# Altium PCB fotolitoTop.PcbDoc (part 3 of 4)
Units mil, origin at the board's own origin, x right, y up, seen from the top; angles counter-clockwise.
Board outline 7874.02 x 11220.47 mil, 2 copper layers (Top Layer, Bottom Layer); 110 components, 0 nets, 500 pads, 136 vias.
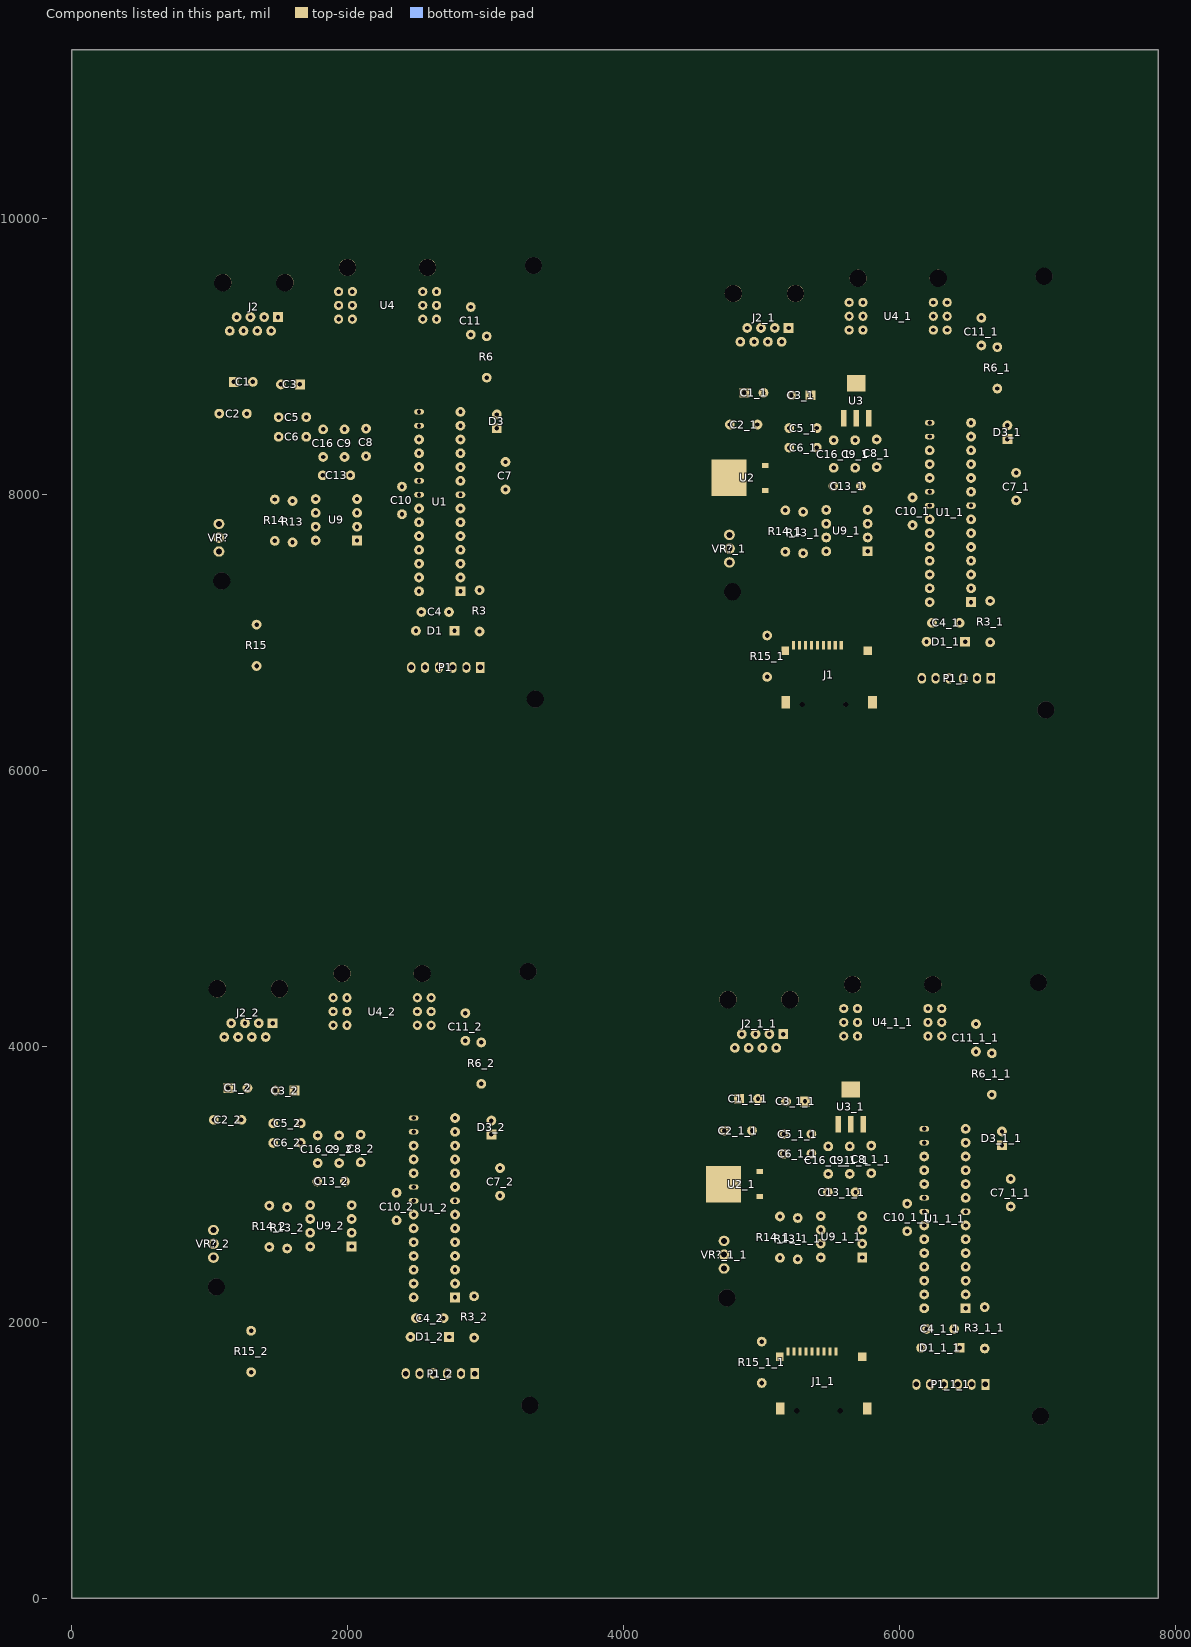
[diagram p3: the components of this part, seen from the top]

## Via types
v1: diameter 70.87, hole 27.56, Top Layer to Bottom Layer, 136 vias

## Nets (pads, with @x,y where several pads share a name; then routed paths per layer and width w, separated by ;. In a path a pad name is that pad's centre, name@x,y a point inside that pad or via, vN(x,y) a via of type N, cw(c..) or ccw(c..) an arc to the next point about the centre after c; other vN are vias at no path point) (continued)
copper on no net: (continued)
  Top Layer w1: 6952.5,2056.09 6952.5,2061.09 ; 6952.5,2063.09 6952.5,2068.09 ; 6952.5,2076.09 6952.5,2081.09 ; 6952.5,2083.09 6952.5,2092.09 ; 6952.5,2093.09 6952.5,2096.09 ; 6952.5,2101.09 6952.5,2105.09 ; 6952.5,2107.09 6952.5,2110.09 ; 6952.5,2112.09 6952.5,2116.09 ; 6952.5,2119.09 6952.5,2124.09 ; 6952.5,2127.09 6952.5,2133.09 ; 6952.5,2136.09 6952.5,2141.09 ; 6952.5,2146.09 6952.5,2164.09 ; 6952.5,2193.09 6952.5,2207.09 ; 6952.5,2208.09 6952.5,2342.09 ; 6952.87,6978.2 6952.87,7032.2 ; 6952.87,7044.2 6952.87,7047.2 ; 6952.87,7059.2 6952.87,7067.2 ; 6952.87,7076.2 6952.87,7082.2 ; 6952.87,7087.2 6952.87,7092.2 ; 6952.87,7121.2 6952.87,7133.2 ; 6952.87,7135.2 6952.87,7164.2 ; 6952.87,7165.2 6952.87,7233.2 ; 6952.87,7325.2 6952.87,7446.2 ; 6953.5,2056.09 6953.5,2061.09 ; 6953.5,2063.09 6953.5,2068.09 ; 6953.5,2076.09 6953.5,2081.09 ; 6953.5,2082.09 6953.5,2091.09 ; 6953.5,2092.09 6953.5,2093.09 ; 6953.5,2094.09 6953.5,2097.09 ; 6953.5,2102.09 6953.5,2105.09 ; 6953.5,2107.09 6953.5,2117.09 ; 6953.5,2119.09 6953.5,2125.09 ; 6953.5,2126.09 6953.5,2134.09 ; 6953.5,2136.09 6953.5,2142.09 ; 6953.5,2145.09 6953.5,2164.09 ; 6953.5,2193.09 6953.5,2342.09 ; 6953.87,6978.2 6953.87,7031.2 ; 6953.87,7044.2 6953.87,7047.2 ; 6953.87,7059.2 6953.87,7066.2 ; 6953.87,7075.2 6953.87,7079.2 ; 6953.87,7080.2 6953.87,7081.2 ; 6953.87,7087.2 6953.87,7091.2 ; 6953.87,7122.2 6953.87,7131.2 ; 6953.87,7136.2 6953.87,7164.2 ; 6953.87,7165.2 6953.87,7237.2 ; 6953.87,7325.2 6953.87,7446.2 ; 6954.5,1955.09 6954.5,1958.09 ; 6954.5,1962.09 6954.5,1963.09 ; 6954.5,2058.09 6954.5,2068.09 ; 6954.5,2076.09 6954.5,2081.09 ; 6954.5,2082.09 6954.5,2090.09 ; 6954.5,2091.09 6954.5,2099.09 ; 6954.5,2101.09 6954.5,2105.09 ; 6954.5,2107.09 6954.5,2117.09 ; 6954.5,2119.09 6954.5,2133.09 ; 6954.5,2135.09 6954.5,2164.09 ; 6954.5,2192.09 6954.5,2343.09 ; 6954.87,6978.2 6954.87,7030.2 ; 6954.87,7044.2 6954.87,7046.2 ; 6954.87,7059.2 6954.87,7064.2 ; 6954.87,7075.2 6954.87,7079.2 ; 6954.87,7087.2 6954.87,7091.2 ; 6954.87,7122.2 6954.87,7129.2 ; 6954.87,7136.2 6954.87,7164.2 ; 6954.87,7165.2 6954.87,7239.2 ; 6954.87,7324.2 6954.87,7447.2 ; 6955.5,1954.09 6955.5,1958.09 ; 6955.5,1962.09 6955.5,1963.09 ; 6955.5,2062.09 6955.5,2068.09 ; 6955.5,2075.09 6955.5,2081.09 ; 6955.5,2082.09 6955.5,2087.09 ; 6955.5,2091.09 6955.5,2106.09 ; 6955.5,2107.09 6955.5,2133.09 ; 6955.5,2134.09 6955.5,2165.09 ; 6955.5,2192.09 6955.5,2343.09 ; 6955.87,6978.2 6955.87,7029.2 ; 6955.87,7044.2 6955.87,7046.2 ; 6955.87,7059.2 6955.87,7062.2 ; 6955.87,7075.2 6955.87,7079.2 ; 6955.87,7086.2 6955.87,7090.2 ; 6955.87,7122.2 6955.87,7129.2 ; 6955.87,7136.2 6955.87,7164.2 ; 6955.87,7165.2 6955.87,7243.2 ; 6955.87,7324.2 6955.87,7447.2 ; 6956.5,1954.09 6956.5,1958.09 ; 6956.5,1962.09 6956.5,1963.09 ; 6956.5,2066.09 6956.5,2068.09 ; 6956.5,2074.09 6956.5,2087.09 ; 6956.5,2090.09 6956.5,2106.09 ; 6956.5,2107.09 6956.5,2165.09 ; 6956.5,2192.09 6956.5,2343.09 ; 6956.87,6978.2 6956.87,7027.2 ; 6956.87,7044.2 6956.87,7046.2 ; 6956.87,7058.2 6956.87,7062.2 ; 6956.87,7075.2 6956.87,7079.2 ; 6956.87,7086.2 6956.87,7090.2 ; 6956.87,7122.2 6956.87,7129.2 ; 6956.87,7137.2 6956.87,7164.2 ; 6956.87,7165.2 6956.87,7245.2 ; 6956.87,7323.2 6956.87,7447.2 ; 6957.5,1954.09 6957.5,1959.09 ; 6957.5,1961.09 6957.5,1963.09 ; 6957.5,2073.09 6957.5,2087.09 ; 6957.5,2088.09 6957.5,2106.09 ; 6957.5,2107.09 6957.5,2165.09 ; 6957.5,2191.09 6957.5,2344.09 ; 6957.87,6978.2 6957.87,7025.2 ; 6957.87,7045.2 6957.87,7046.2 ; 6957.87,7058.2 6957.87,7061.2 ; 6957.87,7074.2 6957.87,7078.2 ; 6957.87,7087.2 6957.87,7090.2 ; 6957.87,7121.2 6957.87,7129.2 ; 6957.87,7131.2 6957.87,7133.2 ; 6957.87,7137.2 6957.87,7163.2 ; 6957.87,7165.2 6957.87,7247.2 ; 6957.87,7323.2 6957.87,7448.2 ; 6958.5,1954.09 6958.5,1959.09 ; 6958.5,1961.09 6958.5,1964.09 ; 6958.5,2073.09 6958.5,2166.09 ; 6958.5,2191.09 6958.5,2344.09 ; 6958.87,6978.2 6958.87,7022.2 ; 6958.87,7058.2 6958.87,7061.2 ; 6958.87,7074.2 6958.87,7078.2 ; 6958.87,7087.2 6958.87,7089.2 ; 6958.87,7121.2 6958.87,7129.2 ; 6958.87,7130.2 6958.87,7134.2 ; 6958.87,7137.2 6958.87,7163.2 ; 6958.87,7165.2 6958.87,7249.2 ; 6958.87,7323.2 6958.87,7448.2 ; 6959.5,1954.09 6959.5,1958.09 ; 6959.5,1961.09 6959.5,1964.09 ; 6959.5,2078.09 6959.5,2166.09 ; 6959.5,2190.09 6959.5,2345.09 ; 6959.87,6978.2 6959.87,7015.2 ; 6959.87,7058.2 6959.87,7060.2 ; 6959.87,7087.2 6959.87,7088.2 ; 6959.87,7122.2 6959.87,7134.2 ; 6959.87,7138.2 6959.87,7164.2 ; 6959.87,7165.2 6959.87,7174.2 ; 6959.87,7175.2 6959.87,7251.2 ; 6959.87,7322.2 6959.87,7448.2 ; 6960.5,1953.09 6960.5,1958.09 ; 6960.5,1960.09 6960.5,1964.09 ; 6960.5,2082.09 6960.5,2166.09 ; 6960.5,2190.09 6960.5,2345.09 ; 6960.87,7058.2 6960.87,7060.2 ; 6960.87,7122.2 6960.87,7134.2 ; 6960.87,7139.2 6960.87,7162.2 ; 6960.87,7166.2 6960.87,7174.2 ; 6960.87,7175.2 6960.87,7192.2 ; 6960.87,7193.2 6960.87,7253.2 ; 6960.87,7322.2 6960.87,7449.2 ; 6961.5,1953.09 6961.5,1958.09 ; 6961.5,1960.09 6961.5,1964.09 ; 6961.5,2086.09 6961.5,2166.09 ; 6961.5,2190.09 6961.5,2345.09 ; 6961.87,7122.2 6961.87,7134.2 ; 6961.87,7140.2 6961.87,7142.2 ; 6961.87,7143.2 6961.87,7146.2 ; 6961.87,7148.2 6961.87,7161.2 ; 6961.87,7166.2 6961.87,7173.2 ; 6961.87,7176.2 6961.87,7191.2 ; 6961.87,7193.2 6961.87,7255.2 ; 6961.87,7322.2 6961.87,7449.2 ; 6962.5,1953.09 6962.5,1958.09 ; 6962.5,1960.09 6962.5,1964.09 ; 6962.5,2089.09 6962.5,2166.09 ; 6962.5,2189.09 6962.5,2345.09 ; 6962.87,7122.2 6962.87,7134.2 ; 6962.87,7144.2 6962.87,7145.2 ; 6962.87,7148.2 6962.87,7161.2 ; 6962.87,7166.2 6962.87,7173.2 ; 6962.87,7177.2 6962.87,7191.2 ; 6962.87,7192.2 6962.87,7257.2 ; 6962.87,7321.2 6962.87,7449.2 ; 6963.5,1953.09 6963.5,1958.09 ; 6963.5,1960.09 6963.5,1964.09 ; 6963.5,2093.09 6963.5,2166.09 ; 6963.5,2189.09 6963.5,2346.09 ; 6963.87,7122.2 6963.87,7129.2 ; 6963.87,7149.2 6963.87,7161.2 ; 6963.87,7166.2 6963.87,7171.2 ; 6963.87,7177.2 6963.87,7259.2 ; 6963.87,7321.2 6963.87,7450.2 ; 6964.5,1954.09 6964.5,1958.09 ; 6964.5,1960.09 6964.5,1964.09 ; 6964.5,2095.09 6964.5,2166.09 ; 6964.5,2189.09 6964.5,2346.09 ; 6964.87,7122.2 6964.87,7128.2 ; 6964.87,7149.2 6964.87,7161.2 ; 6964.87,7166.2 6964.87,7171.2 ; 6964.87,7178.2 6964.87,7260.2 ; 6964.87,7321.2 6964.87,7450.2 ; 6965.5,1954.09 6965.5,1958.09 ; 6965.5,1960.09 6965.5,1964.09 ; 6965.5,2097.09 6965.5,2167.09 ; 6965.5,2188.09 6965.5,2347.09 ; 6965.87,7122.2 6965.87,7127.2 ; 6965.87,7150.2 6965.87,7161.2 ; 6965.87,7166.2 6965.87,7170.2 ; 6965.87,7178.2 6965.87,7190.2 ; 6965.87,7191.2 6965.87,7226.2 ; 6965.87,7228.2 6965.87,7262.2 ; 6965.87,7320.2 6965.87,7451.2 ; 6966.5,1954.09 6966.5,1958.09 ; 6966.5,1960.09 6966.5,1965.09 ; 6966.5,2099.09 6966.5,2167.09 ; 6966.5,2188.09 6966.5,2347.09 ; 6966.87,7122.2 6966.87,7126.2 ; 6966.87,7150.2 6966.87,7161.2 ; 6966.87,7167.2 6966.87,7170.2 ; 6966.87,7178.2 6966.87,7190.2 ; 6966.87,7191.2 6966.87,7226.2 ; 6966.87,7228.2 6966.87,7263.2 ; 6966.87,7320.2 6966.87,7451.2 ; 6967.5,1954.09 6967.5,1958.09 ; 6967.5,1960.09 6967.5,1965.09 ; 6967.5,2100.09 6967.5,2167.09 ; 6967.5,2188.09 6967.5,2347.09 ; 6967.87,7123.2 6967.87,7125.2 ; 6967.87,7149.2 6967.87,7161.2 ; 6967.87,7167.2 6967.87,7170.2 ; 6967.87,7178.2 6967.87,7189.2 ; 6967.87,7191.2 6967.87,7206.2 ; 6967.87,7208.2 6967.87,7226.2 ; 6967.87,7228.2 6967.87,7265.2 ; 6967.87,7320.2 6967.87,7451.2 ; 6968.5,1954.09 6968.5,1958.09 ; 6968.5,1960.09 6968.5,1965.09 ; 6968.5,2101.09 6968.5,2167.09 ; 6968.5,2187.09 6968.5,2348.09 ; 6968.87,7123.2 6968.87,7125.2 ; 6968.87,7149.2 6968.87,7155.2 ; 6968.87,7156.2 6968.87,7162.2 ; 6968.87,7167.2 6968.87,7169.2 ; 6968.87,7178.2 6968.87,7188.2 ; 6968.87,7190.2 6968.87,7205.2 ; 6968.87,7209.2 6968.87,7226.2 ; 6968.87,7228.2 6968.87,7266.2 ; 6968.87,7319.2 6968.87,7452.2 ; 6969.5,1950.09 6969.5,1952.09 ; 6969.5,1954.09 6969.5,1958.09 ; 6969.5,1961.09 6969.5,1965.09 ; 6969.5,2102.09 6969.5,2167.09 ; 6969.5,2187.09 6969.5,2348.09 ; 6969.87,7157.2 6969.87,7162.2 ; 6969.87,7179.2 6969.87,7187.2 ; 6969.87,7191.2 6969.87,7202.2 ; 6969.87,7210.2 6969.87,7226.2 ; 6969.87,7230.2 6969.87,7267.2 ; 6969.87,7319.2 6969.87,7452.2 ; 6970.5,1950.09 6970.5,1952.09 ; 6970.5,1954.09 6970.5,1958.09 ; 6970.5,1961.09 6970.5,1965.09 ; 6970.5,2102.09 6970.5,2167.09 ; 6970.5,2187.09 6970.5,2348.09 ; 6970.87,7157.2 6970.87,7162.2 ; 6970.87,7179.2 6970.87,7184.2 ; 6970.87,7185.2 6970.87,7186.2 ; 6970.87,7192.2 6970.87,7195.2 ; 6970.87,7196.2 6970.87,7202.2 ; 6970.87,7211.2 6970.87,7214.2 ; 6970.87,7216.2 6970.87,7227.2 ; 6970.87,7231.2 6970.87,7259.2 ; 6970.87,7261.2 6970.87,7265.2 ; 6970.87,7266.2 6970.87,7267.2 ; 6970.87,7319.2 6970.87,7452.2 ; 6971.5,1949.09 6971.5,1952.09 ; 6971.5,1954.09 6971.5,1958.09 ; 6971.5,1961.09 6971.5,1965.09 ; 6971.5,1996.09 6971.5,2005.09 ; 6971.5,2016.09 6971.5,2051.09 ; 6971.5,2103.09 6971.5,2167.09 ; 6971.5,2186.09 6971.5,2349.09 ; 6971.87,7157.2 6971.87,7162.2 ; 6971.87,7179.2 6971.87,7184.2 ; 6971.87,7193.2 6971.87,7194.2 ; 6971.87,7197.2 6971.87,7201.2 ; 6971.87,7212.2 6971.87,7213.2 ; 6971.87,7215.2 6971.87,7227.2 ; 6971.87,7232.2 6971.87,7249.2 ; 6971.87,7250.2 6971.87,7257.2 ; 6971.87,7261.2 6971.87,7265.2 ; 6971.87,7318.2 6971.87,7453.2 ; 6972.5,1949.09 6972.5,1953.09 ; 6972.5,1954.09 6972.5,1958.09 ; 6972.5,1961.09 6972.5,1965.09 ; 6972.5,1996.09 6972.5,2005.09 ; 6972.5,2008.09 6972.5,2051.09 ; 6972.5,2104.09 6972.5,2167.09 ; 6972.5,2186.09 6972.5,2349.09 ; 6972.87,7158.2 6972.87,7162.2 ; 6972.87,7179.2 6972.87,7183.2 ; 6972.87,7197.2 6972.87,7201.2 ; 6972.87,7215.2 6972.87,7227.2 ; 6972.87,7232.2 6972.87,7248.2 ; 6972.87,7250.2 6972.87,7257.2 ; 6972.87,7260.2 6972.87,7265.2 ; 6972.87,7318.2 6972.87,7453.2 ; 6973.5,1949.09 6973.5,1953.09 ; 6973.5,1954.09 6973.5,1958.09 ; 6973.5,1961.09 6973.5,1965.09 ; 6973.5,1996.09 6973.5,2051.09 ; 6973.5,2104.09 6973.5,2167.09 ; 6973.5,2186.09 6973.5,2350.09 ; 6973.87,7158.2 6973.87,7161.2 ; 6973.87,7179.2 6973.87,7183.2 ; 6973.87,7197.2 6973.87,7201.2 ; 6973.87,7216.2 6973.87,7227.2 ; 6973.87,7232.2 6973.87,7247.2 ; 6973.87,7250.2 6973.87,7257.2 ; 6973.87,7260.2 6973.87,7265.2 ; 6973.87,7317.2 6973.87,7454.2 ; 6974.5,1948.09 6974.5,1958.09 ; 6974.5,1961.09 6974.5,1966.09 ; 6974.5,1996.09 6974.5,2051.09 ; 6974.5,2104.09 6974.5,2167.09 ; 6974.5,2185.09 6974.5,2350.09 ; 6974.87,7180.2 6974.87,7182.2 ; 6974.87,7197.2 6974.87,7202.2 ; 6974.87,7217.2 6974.87,7220.2 ; 6974.87,7224.2 6974.87,7226.2 ; 6974.87,7233.2 6974.87,7239.2 ; 6974.87,7240.2 6974.87,7243.2 ; 6974.87,7251.2 6974.87,7256.2 ; 6974.87,7262.2 6974.87,7264.2 ; 6974.87,7317.2 6974.87,7319.2 ; 6974.87,7320.2 6974.87,7454.2 ; 6975.5,1948.09 6975.5,1958.09 ; 6975.5,1961.09 6975.5,1966.09 ; 6975.5,1975.09 6975.5,1977.09 ; 6975.5,1996.09 6975.5,1999.09 ; 6975.5,2001.09 6975.5,2052.09 ; 6975.5,2104.09 6975.5,2166.09 ; 6975.5,2185.09 6975.5,2350.09 ; 6975.87,7180.2 6975.87,7182.2 ; 6975.87,7197.2 6975.87,7201.2 ; 6975.87,7235.2 6975.87,7238.2 ; 6975.87,7241.2 6975.87,7243.2 ; 6975.87,7252.2 6975.87,7255.2 ; 6975.87,7317.2 6975.87,7319.2 ; 6975.87,7321.2 6975.87,7454.2 ; 6976.5,1948.09 6976.5,1958.09 ; 6976.5,1961.09 6976.5,1966.09 ; 6976.5,1975.09 6976.5,1977.09 ; 6976.5,1997.09 6976.5,1998.09 ; 6976.5,2001.09 6976.5,2052.09 ; 6976.5,2104.09 6976.5,2166.09 ; 6976.5,2184.09 6976.5,2351.09 ; 6976.87,7197.2 6976.87,7201.2 ; 6976.87,7253.2 6976.87,7254.2 ; 6976.87,7316.2 6976.87,7318.2 ; 6976.87,7322.2 6976.87,7336.2 ; 6976.87,7337.2 6976.87,7388.2 ; 6976.87,7392.2 6976.87,7454.2 ; 6977.5,1948.09 6977.5,1958.09 ; 6977.5,1961.09 6977.5,1966.09 ; 6977.5,1975.09 6977.5,1977.09 ; 6977.5,2001.09 6977.5,2053.09 ; 6977.5,2104.09 6977.5,2166.09 ; 6977.5,2184.09 6977.5,2351.09 ; 6977.87,7197.2 6977.87,7201.2 ; 6977.87,7327.2 6977.87,7331.2 ; 6977.87,7340.2 6977.87,7358.2 ; 6977.87,7360.2 6977.87,7364.2 ; 6977.87,7366.2 6977.87,7376.2 ; 6977.87,7378.2 6977.87,7381.2 ; 6977.87,7383.2 6977.87,7388.2 ; 6977.87,7393.2 6977.87,7412.2 ; 6977.87,7413.2 6977.87,7418.2 ; 6977.87,7419.2 6977.87,7455.2 ; 6978.5,1917.09 6978.5,1920.09 ; 6978.5,1943.09 6978.5,1946.09 ; 6978.5,1948.09 6978.5,1958.09 ; 6978.5,1961.09 6978.5,1966.09 ; 6978.5,1975.09 6978.5,1977.09 ; 6978.5,2001.09 6978.5,2006.09 ; 6978.5,2007.09 6978.5,2053.09 ; 6978.5,2104.09 6978.5,2166.09 ; 6978.5,2184.09 6978.5,2351.09 ; 6978.87,7197.2 6978.87,7201.2 ; 6978.87,7345.2 6978.87,7350.2 ; 6978.87,7352.2 6978.87,7357.2 ; 6978.87,7360.2 6978.87,7363.2 ; 6978.87,7369.2 6978.87,7375.2 ; 6978.87,7383.2 6978.87,7388.2 ; 6978.87,7394.2 6978.87,7412.2 ; 6978.87,7414.2 6978.87,7418.2 ; 6978.87,7421.2 6978.87,7455.2 ; 6979.5,1916.09 6979.5,1920.09 ; 6979.5,1943.09 6979.5,1946.09 ; 6979.5,1948.09 6979.5,1958.09 ; 6979.5,1961.09 6979.5,1966.09 ; 6979.5,1975.09 6979.5,1977.09 ; 6979.5,1990.09 6979.5,1993.09 ; 6979.5,2001.09 6979.5,2006.09 ; 6979.5,2007.09 6979.5,2054.09 ; 6979.5,2104.09 6979.5,2166.09 ; 6979.5,2183.09 6979.5,2351.09 ; 6979.87,7198.2 6979.87,7201.2 ; 6979.87,7345.2 6979.87,7348.2 ; 6979.87,7352.2 6979.87,7356.2 ; 6979.87,7361.2 6979.87,7362.2 ; 6979.87,7384.2 6979.87,7387.2 ; 6979.87,7395.2 6979.87,7397.2 ; 6979.87,7399.2 6979.87,7407.2 ; 6979.87,7409.2 6979.87,7411.2 ; 6979.87,7416.2 6979.87,7417.2 ; 6979.87,7423.2 6979.87,7442.2 ; 6979.87,7452.2 6979.87,7454.2 ; 6980.5,1916.09 6980.5,1920.09 ; 6980.5,1942.09 6980.5,1947.09 ; 6980.5,1948.09 6980.5,1958.09 ; 6980.5,1961.09 6980.5,1965.09 ; 6980.5,1975.09 6980.5,1977.09 ; 6980.5,1990.09 6980.5,1993.09 ; 6980.5,2001.09 6980.5,2006.09 ; 6980.5,2008.09 6980.5,2055.09 ; 6980.5,2104.09 6980.5,2166.09 ; 6980.5,2183.09 6980.5,2352.09 ; 6980.87,7345.2 6980.87,7347.2 ; 6980.87,7400.2 6980.87,7403.2 ; 6981.5,1916.09 6981.5,1921.09 ; 6981.5,1942.09 6981.5,1958.09 ; 6981.5,1961.09 6981.5,1965.09 ; 6981.5,1974.09 6981.5,1977.09 ; 6981.5,1990.09 6981.5,1993.09 ; 6981.5,2001.09 6981.5,2006.09 ; 6981.5,2008.09 6981.5,2055.09 ; 6981.5,2104.09 6981.5,2166.09 ; 6981.5,2183.09 6981.5,2352.09 ; 6982.5,1916.09 6982.5,1921.09 ; 6982.5,1941.09 6982.5,1948.09 ; 6982.5,1949.09 6982.5,1958.09 ; 6982.5,1961.09 6982.5,1966.09 ; 6982.5,1975.09 6982.5,1977.09 ; 6982.5,1990.09 6982.5,1994.09 ; 6982.5,2001.09 6982.5,2006.09 ; 6982.5,2008.09 6982.5,2056.09 ; 6982.5,2103.09 6982.5,2166.09 ; 6982.5,2182.09 6982.5,2353.09 ; 6983.5,1916.09 6983.5,1921.09 ; 6983.5,1941.09 6983.5,1948.09 ; 6983.5,1949.09 6983.5,1958.09 ; 6983.5,1961.09 6983.5,1966.09 ; 6983.5,1975.09 6983.5,1977.09 ; 6983.5,1991.09 6983.5,1994.09 ; 6983.5,2000.09 6983.5,2006.09 ; 6983.5,2007.09 6983.5,2057.09 ; 6983.5,2102.09 6983.5,2165.09 ; 6983.5,2182.09 6983.5,2353.09 ; 6983.87,7332.2 6983.87,7334.2 ; 6983.87,7366.2 6983.87,7369.2 ; 6983.87,7389.2 6983.87,7390.2 ; 6983.87,7399.2 6983.87,7400.2 ; 6983.87,7412.2 6983.87,7414.2 ; 6983.87,7431.2 6983.87,7433.2 ; 6983.87,7447.2 6983.87,7449.2 ; 6984.5,1916.09 6984.5,1921.09 ; 6984.5,1941.09 6984.5,1958.09 ; 6984.5,1961.09 6984.5,1966.09 ; 6984.5,1975.09 6984.5,1977.09 ; 6984.5,1991.09 6984.5,1994.09 ; 6984.5,1999.09 6984.5,2006.09 ; 6984.5,2007.09 6984.5,2058.09 ; 6984.5,2102.09 6984.5,2165.09 ; 6984.5,2182.09 6984.5,2353.09 ; 6984.87,7314.2 6984.87,7315.2 ; 6984.87,7331.2 6984.87,7335.2 ; 6984.87,7352.2 6984.87,7354.2 ; 6984.87,7360.2 6984.87,7363.2 ; 6984.87,7365.2 6984.87,7369.2 ; 6984.87,7383.2 6984.87,7384.2 ; 6984.87,7388.2 6984.87,7391.2 ; 6984.87,7396.2 6984.87,7401.2 ; 6984.87,7405.2 6984.87,7410.2 ; 6984.87,7412.2 6984.87,7415.2 ; 6984.87,7418.2 6984.87,7420.2 ; 6984.87,7423.2 6984.87,7425.2 ; 6984.87,7430.2 6984.87,7438.2 ; 6984.87,7446.2 6984.87,7456.2 ; 6985.5,1917.09 6985.5,1921.09 ; 6985.5,1941.09 6985.5,1958.09 ; 6985.5,1961.09 6985.5,1966.09 ; 6985.5,1975.09 6985.5,1977.09 ; 6985.5,1991.09 6985.5,1994.09 ; 6985.5,1999.09 6985.5,2060.09 ; 6985.5,2101.09 6985.5,2165.09 ; 6985.5,2181.09 6985.5,2354.09 ; 6985.87,7313.2 6985.87,7316.2 ; 6985.87,7330.2 6985.87,7335.2 ; 6985.87,7348.2 6985.87,7354.2 ; 6985.87,7357.2 6985.87,7369.2 ; 6985.87,7370.2 6985.87,7377.2 ; 6985.87,7382.2 6985.87,7384.2 ; 6985.87,7387.2 6985.87,7390.2 ; 6985.87,7393.2 6985.87,7415.2 ; 6985.87,7417.2 6985.87,7439.2 ; 6985.87,7445.2 6985.87,7458.2 ; 6986.5,1918.09 6986.5,1921.09 ; 6986.5,1941.09 6986.5,1958.09 ; 6986.5,1961.09 6986.5,1966.09 ; 6986.5,1975.09 6986.5,1977.09 ; 6986.5,1992.09 6986.5,1994.09 ; 6986.5,1999.09 6986.5,2061.09 ; 6986.5,2099.09 6986.5,2165.09 ; 6986.5,2181.09 6986.5,2354.09 ; 6986.87,7211.2 6986.87,7213.2 ; 6986.87,7275.2 6986.87,7280.2 ; 6986.87,7313.2 6986.87,7316.2 ; 6986.87,7319.2 6986.87,7321.2 ; 6986.87,7329.2 6986.87,7338.2 ; 6986.87,7345.2 6986.87,7368.2 ; 6986.87,7370.2 6986.87,7390.2 ; 6986.87,7392.2 6986.87,7440.2 ; 6986.87,7445.2 6986.87,7458.2 ; 6987.5,1918.09 6987.5,1921.09 ; 6987.5,1941.09 6987.5,1958.09 ; 6987.5,1961.09 6987.5,1966.09 ; 6987.5,1975.09 6987.5,1977.09 ; 6987.5,1992.09 6987.5,1994.09 ; 6987.5,1999.09 6987.5,2063.09 ; 6987.5,2098.09 6987.5,2164.09 ; 6987.5,2180.09 6987.5,2354.09 ; 6987.87,7210.2 6987.87,7214.2 ; 6987.87,7230.2 6987.87,7232.2 ; 6987.87,7274.2 6987.87,7280.2 ; 6987.87,7313.2 6987.87,7315.2 ; 6987.87,7318.2 6987.87,7322.2 ; 6987.87,7328.2 6987.87,7338.2 ; 6987.87,7341.2 6987.87,7368.2 ; 6987.87,7370.2 6987.87,7390.2 ; 6987.87,7391.2 6987.87,7458.2 ; 6988.5,1918.09 6988.5,1922.09 ; 6988.5,1942.09 6988.5,1958.09 ; 6988.5,1961.09 6988.5,1966.09 ; 6988.5,1975.09 6988.5,1977.09 ; 6988.5,1992.09 6988.5,1994.09 ; 6988.5,1999.09 6988.5,2066.09 ; 6988.5,2095.09 6988.5,2164.09 ; 6988.5,2180.09 6988.5,2355.09 ; 6988.87,7208.2 6988.87,7214.2 ; 6988.87,7229.2 6988.87,7233.2 ; 6988.87,7272.2 6988.87,7281.2 ; 6988.87,7312.2 6988.87,7323.2 ; 6988.87,7326.2 6988.87,7390.2 ; 6988.87,7391.2 6988.87,7459.2 ; 6989.5,1918.09 6989.5,1922.09 ; 6989.5,1926.09 6989.5,1927.09 ; 6989.5,1942.09 6989.5,1958.09 ; 6989.5,1961.09 6989.5,1967.09 ; 6989.5,1975.09 6989.5,1977.09 ; 6989.5,1993.09 6989.5,1994.09 ; 6989.5,1999.09 6989.5,2070.09 ; 6989.5,2092.09 6989.5,2164.09 ; 6989.5,2180.09 6989.5,2355.09 ; 6989.87,7176.2 6989.87,7178.2 ; 6989.87,7183.2 6989.87,7185.2 ; 6989.87,7196.2 6989.87,7198.2 ; 6989.87,7202.2 6989.87,7204.2 ; 6989.87,7207.2 6989.87,7214.2 ; 6989.87,7220.2 6989.87,7222.2 ; 6989.87,7226.2 6989.87,7228.2 ; 6989.87,7229.2 6989.87,7233.2 ; 6989.87,7237.2 6989.87,7240.2 ; 6989.87,7271.2 6989.87,7281.2 ; 6989.87,7312.2 6989.87,7323.2 ; 6989.87,7325.2 6989.87,7459.2 ; 6990.5,1918.09 6990.5,1922.09 ; 6990.5,1926.09 6990.5,1928.09 ; 6990.5,1942.09 6990.5,1958.09 ; 6990.5,1961.09 6990.5,1967.09 ; 6990.5,1975.09 6990.5,1977.09 ; 6990.5,1993.09 6990.5,1995.09 ; 6990.5,1999.09 6990.5,2164.09 ; 6990.5,2180.09 6990.5,2355.09 ; 6990.87,7175.2 6990.87,7178.2 ; 6990.87,7182.2 6990.87,7186.2 ; 6990.87,7195.2 6990.87,7199.2 ; 6990.87,7201.2 6990.87,7205.2 ; 6990.87,7206.2 6990.87,7215.2 ; 6990.87,7219.2 6990.87,7223.2 ; 6990.87,7225.2 6990.87,7228.2 ; 6990.87,7229.2 6990.87,7234.2 ; 6990.87,7237.2 6990.87,7241.2 ; 6990.87,7255.2 6990.87,7258.2 ; 6990.87,7266.2 6990.87,7268.2 ; 6990.87,7270.2 6990.87,7281.2 ; 6990.87,7311.2 6990.87,7324.2 ; 6990.87,7326.2 6990.87,7460.2 ; 6991.5,1918.09 6991.5,1922.09 ; 6991.5,1925.09 6991.5,1928.09 ; 6991.5,1941.09 6991.5,1958.09 ; 6991.5,1961.09 6991.5,1967.09 ; 6991.5,1974.09 6991.5,1977.09 ; 6991.5,1993.09 6991.5,1995.09 ; 6991.5,1999.09 6991.5,2163.09 ; 6991.5,2179.09 6991.5,2356.09 ; 6991.87,7174.2 6991.87,7179.2 ; 6991.87,7181.2 6991.87,7186.2 ; 6991.87,7194.2 6991.87,7199.2 ; 6991.87,7201.2 6991.87,7210.2 ; 6991.87,7211.2 6991.87,7214.2 ; 6991.87,7219.2 6991.87,7223.2 ; 6991.87,7225.2 6991.87,7228.2 ; 6991.87,7230.2 6991.87,7234.2 ; 6991.87,7237.2 6991.87,7242.2 ; 6991.87,7245.2 6991.87,7251.2 ; 6991.87,7254.2 6991.87,7259.2 ; 6991.87,7264.2 6991.87,7282.2 ; 6991.87,7311.2 6991.87,7325.2 ; 6991.87,7326.2 6991.87,7460.2 ; 6992.5,1808.09 6992.5,1809.09 ; 6992.5,1918.09 6992.5,1922.09 ; 6992.5,1925.09 6992.5,1928.09 ; 6992.5,1941.09 6992.5,1958.09 ; 6992.5,1960.09 6992.5,1967.09 ; 6992.5,1974.09 6992.5,1978.09 ; 6992.5,1993.09 6992.5,1995.09 ; 6992.5,2000.09 6992.5,2163.09 ; 6992.5,2179.09 6992.5,2356.09 ; 6992.87,7174.2 6992.87,7179.2 ; 6992.87,7181.2 6992.87,7186.2 ; 6992.87,7194.2 6992.87,7199.2 ; 6992.87,7200.2 6992.87,7209.2 ; 6992.87,7210.2 6992.87,7211.2 ; 6992.87,7212.2 6992.87,7215.2 ; 6992.87,7220.2 6992.87,7223.2 ; 6992.87,7225.2 6992.87,7235.2 ; 6992.87,7237.2 6992.87,7243.2 ; 6992.87,7244.2 6992.87,7252.2 ; 6992.87,7254.2 6992.87,7260.2 ; 6992.87,7263.2 6992.87,7282.2 ; 6992.87,7311.2 6992.87,7460.2 ; 6993.5,1806.09 6993.5,1811.09 ; 6993.5,1918.09 6993.5,1922.09 ; 6993.5,1925.09 6993.5,1928.09 ; 6993.5,1942.09 6993.5,1958.09 ; 6993.5,1960.09 6993.5,1967.09 ; 6993.5,1973.09 6993.5,1978.09 ; 6993.5,1994.09 6993.5,1995.09 ; 6993.5,2000.09 6993.5,2162.09 ; 6993.5,2178.09 6993.5,2357.09 ; 6993.87,7073.2 6993.87,7076.2 ; 6993.87,7080.2 6993.87,7081.2 ; 6993.87,7176.2 6993.87,7186.2 ; 6993.87,7194.2 6993.87,7199.2 ; 6993.87,7200.2 6993.87,7208.2 ; 6993.87,7209.2 6993.87,7217.2 ; 6993.87,7219.2 6993.87,7223.2 ; 6993.87,7225.2 6993.87,7235.2 ; 6993.87,7237.2 6993.87,7251.2 ; 6993.87,7253.2 6993.87,7282.2 ; 6993.87,7310.2 6993.87,7461.2 ; 6994.5,1805.09 6994.5,1812.09 ; 6994.5,1918.09 6994.5,1922.09 ; 6994.5,1925.09 6994.5,1928.09 ; 6994.5,1942.09 6994.5,1958.09 ; 6994.5,1960.09 6994.5,1966.09 ; 6994.5,1973.09 6994.5,1978.09 ; 6994.5,1994.09 6994.5,1995.09 ; 6994.5,2000.09 6994.5,2162.09 ; 6994.5,2178.09 6994.5,2357.09 ; 6994.87,7072.2 6994.87,7076.2 ; 6994.87,7080.2 6994.87,7081.2 ; 6994.87,7180.2 6994.87,7186.2 ; 6994.87,7193.2 6994.87,7199.2 ; 6994.87,7200.2 6994.87,7205.2 ; 6994.87,7209.2 6994.87,7224.2 ; 6994.87,7225.2 6994.87,7251.2 ; 6994.87,7252.2 6994.87,7283.2 ; 6994.87,7310.2 6994.87,7461.2 ; 6995.5,1804.09 6995.5,1812.09 ; 6995.5,1840.09 6995.5,1842.09 ; 6995.5,1918.09 6995.5,1922.09 ; 6995.5,1924.09 6995.5,1930.09 ; 6995.5,1942.09 6995.5,1958.09 ; 6995.5,1960.09 6995.5,1966.09 ; 6995.5,1972.09 6995.5,1978.09 ; 6995.5,2001.09 6995.5,2161.09 ; 6995.87,7072.2 6995.87,7076.2 ; 6995.87,7080.2 6995.87,7081.2 ; 6995.87,7184.2 6995.87,7186.2 ; 6995.87,7192.2 6995.87,7205.2 ; 6995.87,7208.2 6995.87,7224.2 ; 6995.87,7225.2 6995.87,7283.2 ; 6995.87,7310.2 6995.87,7461.2 ; 6996.5,1804.09 6996.5,1811.09 ; 6996.5,1840.09 6996.5,1842.09 ; 6996.5,1918.09 6996.5,1921.09 ; 6996.5,1924.09 6996.5,1931.09 ; 6996.5,1943.09 6996.5,1958.09 ; 6996.5,1960.09 6996.5,1966.09 ; 6996.5,1970.09 6996.5,1978.09 ; 6996.5,2001.09 6996.5,2161.09 ; 6996.5,2177.09 6996.5,2358.09 ; 6996.87,7072.2 6996.87,7077.2 ; 6996.87,7079.2 6996.87,7081.2 ; 6996.87,7191.2 6996.87,7205.2 ; 6996.87,7206.2 6996.87,7224.2 ; 6996.87,7225.2 6996.87,7283.2 ; 6996.87,7309.2 6996.87,7462.2 ; 6997.5,1806.09 6997.5,1811.09 ; 6997.5,1839.09 6997.5,1842.09 ; 6997.5,1918.09 6997.5,1921.09 ; 6997.5,1924.09 6997.5,1932.09 ; 6997.5,1943.09 6997.5,1958.09 ; 6997.5,1960.09 6997.5,1966.09 ; 6997.5,1968.09 6997.5,1978.09 ; 6997.5,2001.09 6997.5,2161.09 ; 6997.5,2177.09 6997.5,2358.09 ; 6997.87,7072.2 6997.87,7077.2 ; 6997.87,7079.2 6997.87,7082.2 ; 6997.87,7191.2 6997.87,7284.2 ; 6997.87,7309.2 6997.87,7462.2 ; 6998.5,1807.09 6998.5,1811.09 ; 6998.5,1839.09 6998.5,1842.09 ; 6998.5,1846.09 6998.5,1850.09 ; 6998.5,1918.09 6998.5,1921.09 ; 6998.5,1923.09 6998.5,1933.09 ; 6998.5,1943.09 6998.5,1958.09 ; 6998.5,1960.09 6998.5,1965.09 ; 6998.5,1968.09 6998.5,1978.09 ; 6998.5,2001.09 6998.5,2160.09 ; 6998.5,2177.09 6998.5,2358.09 ; 6998.87,7072.2 6998.87,7076.2 ; 6998.87,7079.2 6998.87,7082.2 ; 6998.87,7196.2 6998.87,7284.2 ; 6998.87,7308.2 6998.87,7463.2 ; 6999.5,1807.09 6999.5,1812.09 ; 6999.5,1838.09 6999.5,1842.09 ; 6999.5,1846.09 6999.5,1851.09 ; 6999.5,1918.09 6999.5,1921.09 ; 6999.5,1923.09 6999.5,1932.09 ; 6999.5,1943.09 6999.5,1958.09 ; 6999.5,1960.09 6999.5,1965.09 ; 6999.5,1967.09 6999.5,1978.09 ; 6999.5,2001.09 6999.5,2160.09 ; 6999.5,2176.09 6999.5,2359.09 ; 6999.87,7071.2 6999.87,7076.2 ; 6999.87,7078.2 6999.87,7082.2 ; 6999.87,7200.2 6999.87,7284.2 ; 6999.87,7308.2 6999.87,7463.2 ; 7000.5,1807.09 7000.5,1812.09 ; 7000.5,1838.09 7000.5,1842.09 ; 7000.5,1845.09 7000.5,1851.09 ; 7000.5,1918.09 7000.5,1921.09 ; 7000.5,1923.09 7000.5,1930.09 ; 7000.5,1943.09 7000.5,1958.09 ; 7000.5,1960.09 7000.5,1965.09 ; 7000.5,1967.09 7000.5,1978.09 ; 7000.5,2001.09 7000.5,2159.09 ; 7000.5,2176.09 7000.5,2359.09 ; 7000.87,7071.2 7000.87,7076.2 ; 7000.87,7078.2 7000.87,7082.2 ; 7000.87,7204.2 7000.87,7284.2 ; 7000.87,7308.2 7000.87,7463.2 ; 7001.5,1807.09 7001.5,1812.09 ; 7001.5,1838.09 7001.5,1842.09 ; 7001.5,1845.09 7001.5,1851.09 ; 7001.5,1918.09 7001.5,1921.09 ; 7001.5,1922.09 7001.5,1928.09 ; 7001.5,1943.09 7001.5,1958.09 ; 7001.5,1960.09 7001.5,1965.09 ; 7001.5,1967.09 7001.5,1978.09 ; 7001.5,1998.09 7001.5,1999.09 ; 7001.5,2001.09 7001.5,2159.09 ; 7001.5,2175.09 7001.5,2360.09 ; 7001.87,7071.2 7001.87,7076.2 ; 7001.87,7078.2 7001.87,7082.2 ; 7001.87,7207.2 7001.87,7284.2 ; 7001.87,7307.2 7001.87,7463.2 ; 7002.5,1805.09 7002.5,1811.09 ; 7002.5,1833.09 7002.5,1837.09 ; 7002.5,1838.09 7002.5,1842.09 ; 7002.5,1845.09 7002.5,1851.09 ; 7002.5,1852.09 7002.5,1855.09 ; 7002.5,1918.09 7002.5,1921.09 ; 7002.5,1922.09 7002.5,1928.09 ; 7002.5,1943.09 7002.5,1959.09 ; 7002.5,1960.09 7002.5,1965.09 ; 7002.5,1967.09 7002.5,1978.09 ; 7002.5,1999.09 7002.5,2158.09 ; 7002.5,2175.09 7002.5,2360.09 ; 7002.87,7071.2 7002.87,7076.2 ; 7002.87,7078.2 7002.87,7082.2 ; 7002.87,7211.2 7002.87,7284.2 ; 7002.87,7307.2 7002.87,7464.2 ; 7003.5,1805.09 7003.5,1811.09 ; 7003.5,1829.09 7003.5,1831.09 ; 7003.5,1832.09 7003.5,1837.09 ; 7003.5,1838.09 7003.5,1842.09 ; 7003.5,1845.09 7003.5,1851.09 ; 7003.5,1852.09 7003.5,1855.09 ; 7003.5,1918.09 7003.5,1921.09 ; 7003.5,1922.09 7003.5,1928.09 ; 7003.5,1942.09 7003.5,1959.09 ; 7003.5,1960.09 7003.5,1965.09 ; 7003.5,1968.09 7003.5,1978.09 ; 7003.5,2000.09 7003.5,2157.09 ; 7003.5,2175.09 7003.5,2360.09 ; 7003.87,7072.2 7003.87,7076.2 ; 7003.87,7078.2 7003.87,7082.2 ; 7003.87,7213.2 7003.87,7284.2 ; 7003.87,7307.2 7003.87,7464.2 ; 7004.5,1807.09 7004.5,1812.09 ; 7004.5,1828.09 7004.5,1842.09 ; 7004.5,1845.09 7004.5,1850.09 ; 7004.5,1851.09 7004.5,1856.09 ; 7004.5,1918.09 7004.5,1928.09 ; 7004.5,1942.09 7004.5,1966.09 ; 7004.5,1968.09 7004.5,1978.09 ; 7004.5,2001.09 7004.5,2157.09 ; 7004.5,2175.09 7004.5,2360.09 ; 7004.87,7072.2 7004.87,7076.2 ; 7004.87,7078.2 7004.87,7082.2 ; 7004.87,7215.2 7004.87,7285.2 ; 7004.87,7306.2 7004.87,7465.2 ; 7005.5,1807.09 7005.5,1812.09 ; 7005.5,1828.09 7005.5,1842.09 ; 7005.5,1845.09 7005.5,1850.09 ; 7005.5,1851.09 7005.5,1857.09 ; 7005.5,1918.09 7005.5,1929.09 ; 7005.5,1942.09 7005.5,1966.09 ; 7005.5,1968.09 7005.5,1978.09 ; 7005.5,2001.09 7005.5,2156.09 ; 7005.5,2174.09 7005.5,2361.09 ; 7005.87,7072.2 7005.87,7076.2 ; 7005.87,7078.2 7005.87,7083.2 ; 7005.87,7217.2 7005.87,7285.2 ; 7005.87,7306.2 7005.87,7465.2 ; 7006.5,1807.09 7006.5,1811.09 ; 7006.5,1812.09 7006.5,1814.09 ; 7006.5,1828.09 7006.5,1835.09 ; 7006.5,1836.09 7006.5,1837.09 ; 7006.5,1838.09 7006.5,1842.09 ; 7006.5,1845.09 7006.5,1857.09 ; 7006.5,1918.09 7006.5,1930.09 ; 7006.5,1942.09 7006.5,1958.09 ; 7006.5,1960.09 7006.5,1978.09 ; 7006.5,2002.09 7006.5,2155.09 ; 7006.5,2174.09 7006.5,2235.09 ; 7006.5,2299.09 7006.5,2361.09 ; 7006.87,7072.2 7006.87,7076.2 ; 7006.87,7078.2 7006.87,7083.2 ; 7006.87,7218.2 7006.87,7285.2 ; 7006.87,7306.2 7006.87,7465.2 ; 7007.5,1807.09 7007.5,1816.09 ; 7007.5,1824.09 7007.5,1825.09 ; 7007.5,1828.09 7007.5,1834.09 ; 7007.5,1838.09 7007.5,1842.09 ; 7007.5,1845.09 7007.5,1857.09 ; 7007.5,1916.09 7007.5,1931.09 ; 7007.5,1941.09 7007.5,1958.09 ; 7007.5,1960.09 7007.5,1978.09 ; 7007.5,2002.09 7007.5,2155.09 ; 7007.5,2173.09 7007.5,2234.09 ; 7007.5,2299.09 7007.5,2362.09 ; 7007.87,7072.2 7007.87,7076.2 ; 7007.87,7078.2 7007.87,7083.2 ; 7007.87,7219.2 7007.87,7285.2 ; 7007.87,7305.2 7007.87,7466.2 ; 7008.5,1806.09 7008.5,1817.09 ; 7008.5,1823.09 7008.5,1827.09 ; 7008.5,1828.09 7008.5,1835.09 ; 7008.5,1838.09 7008.5,1842.09 ; 7008.5,1845.09 7008.5,1857.09 ; 7008.5,1916.09 7008.5,1933.09 ; 7008.5,1941.09 7008.5,1958.09 ; 7008.5,1960.09 7008.5,1978.09 ; 7008.5,2003.09 7008.5,2154.09 ; 7008.5,2173.09 7008.5,2234.09 ; 7008.5,2299.09 7008.5,2362.09 ; 7008.87,7068.2 7008.87,7070.2 ; 7008.87,7072.2 7008.87,7076.2 ; 7008.87,7079.2 7008.87,7083.2 ; 7008.87,7220.2 7008.87,7285.2 ; 7008.87,7305.2 7008.87,7466.2 ; 7009.5,1804.09 7009.5,1817.09 ; 7009.5,1822.09 7009.5,1836.09 ; 7009.5,1837.09 7009.5,1842.09 ; 7009.5,1845.09 7009.5,1857.09 ; 7009.5,1916.09 7009.5,1932.09 ; 7009.5,1941.09 7009.5,1978.09 ; 7009.5,2004.09 7009.5,2153.09 ; 7009.5,2173.09 7009.5,2234.09 ; 7009.5,2300.09 7009.5,2362.09 ; 7009.87,7068.2 7009.87,7070.2 ; 7009.87,7072.2 7009.87,7076.2 ; 7009.87,7079.2 7009.87,7083.2 ; 7009.87,7220.2 7009.87,7285.2 ; 7009.87,7305.2 7009.87,7466.2 ; 7010.5,1802.09 7010.5,1818.09 ; 7010.5,1820.09 7010.5,1842.09 ; 7010.5,1845.09 7010.5,1857.09 ; 7010.5,1916.09 7010.5,1937.09 ; 7010.5,1940.09 7010.5,1958.09 ; 7010.5,1960.09 7010.5,1978.09 ; 7010.5,2005.09 7010.5,2152.09 ; 7010.5,2172.09 7010.5,2234.09 ; 7010.5,2300.09 7010.5,2363.09 ; 7010.87,7067.2 7010.87,7070.2 ; 7010.87,7072.2 7010.87,7076.2 ; 7010.87,7079.2 7010.87,7083.2 ; 7010.87,7114.2 7010.87,7123.2 ; 7010.87,7134.2 7010.87,7169.2 ; 7010.87,7221.2 7010.87,7285.2 ; 7010.87,7304.2 7010.87,7467.2 ; 7011.5,1801.09 7011.5,1818.09 ; 7011.5,1819.09 7011.5,1842.09 ; 7011.5,1844.09 7011.5,1856.09 ; 7011.5,1916.09 7011.5,1939.09 ; 7011.5,1940.09 7011.5,1958.09 ; 7011.5,1960.09 7011.5,1978.09 ; 7011.5,2006.09 7011.5,2151.09 ; 7011.5,2172.09 7011.5,2233.09 ; 7011.5,2300.09 7011.5,2363.09 ; 7011.87,7067.2 7011.87,7071.2 ; 7011.87,7072.2 7011.87,7076.2 ; 7011.87,7079.2 7011.87,7083.2 ; 7011.87,7114.2 7011.87,7123.2 ; 7011.87,7126.2 7011.87,7169.2 ; 7011.87,7222.2 7011.87,7285.2 ; 7011.87,7304.2 7011.87,7467.2 ; 7012.5,1800.09 7012.5,1817.09 ; 7012.5,1819.09 7012.5,1842.09 ; 7012.5,1844.09 7012.5,1857.09 ; 7012.5,1916.09 7012.5,1978.09 ; 7012.5,2007.09 7012.5,2151.09 ; 7012.5,2172.09 7012.5,2233.09 ; 7012.5,2301.09 7012.5,2363.09 ; 7012.87,7067.2 7012.87,7071.2 ; 7012.87,7072.2 7012.87,7076.2 ; 7012.87,7079.2 7012.87,7083.2 ; 7012.87,7114.2 7012.87,7169.2 ; 7012.87,7222.2 7012.87,7285.2 ; 7012.87,7304.2 7012.87,7468.2 ; 7013.5,1798.09 7013.5,1817.09 ; 7013.5,1819.09 7013.5,1842.09 ; 7013.5,1843.09 7013.5,1857.09 ; 7013.5,1916.09 7013.5,1978.09 ; 7013.5,2008.09 7013.5,2150.09 ; 7013.5,2171.09 7013.5,2233.09 ; 7013.5,2301.09 7013.5,2364.09 ; 7013.87,7066.2 7013.87,7076.2 ; 7013.87,7079.2 7013.87,7084.2 ; 7013.87,7114.2 7013.87,7169.2 ; 7013.87,7222.2 7013.87,7285.2 ; 7013.87,7303.2 7013.87,7468.2 ; 7014.5,1798.09 7014.5,1818.09 ; 7014.5,1819.09 7014.5,1857.09 ; 7014.5,1917.09 7014.5,1978.09 ; 7014.5,2009.09 7014.5,2148.09 ; 7014.5,2171.09 7014.5,2233.09 ; 7014.5,2301.09 7014.5,2364.09 ; 7014.87,7066.2 7014.87,7076.2 ; 7014.87,7079.2 7014.87,7084.2 ; 7014.87,7093.2 7014.87,7095.2 ; 7014.87,7114.2 7014.87,7117.2 ; 7014.87,7119.2 7014.87,7170.2 ; 7014.87,7222.2 7014.87,7284.2 ; 7014.87,7303.2 7014.87,7468.2 ; 7015.5,1798.09 7015.5,1860.09 ; 7015.5,1917.09 7015.5,1978.09 ; 7015.5,2010.09 7015.5,2148.09 ; 7015.5,2171.09 7015.5,2232.09 ; 7015.5,2301.09 7015.5,2365.09 ; 7015.87,7066.2 7015.87,7076.2 ; 7015.87,7079.2 7015.87,7084.2 ; 7015.87,7093.2 7015.87,7095.2 ; 7015.87,7115.2 7015.87,7116.2 ; 7015.87,7119.2 7015.87,7170.2 ; 7015.87,7222.2 7015.87,7284.2 ; 7015.87,7302.2 7015.87,7469.2 ; 7016.5,1798.09 7016.5,1805.09 ; 7016.5,1806.09 7016.5,1860.09 ; 7016.5,1917.09 7016.5,1978.09 ; 7016.5,2011.09 7016.5,2147.09 ; 7016.5,2170.09 7016.5,2232.09 ; 7016.5,2302.09 7016.5,2365.09 ; 7016.87,7066.2 7016.87,7076.2 ; 7016.87,7079.2 7016.87,7084.2 ; 7016.87,7093.2 7016.87,7095.2 ; 7016.87,7119.2 7016.87,7171.2 ; 7016.87,7222.2 7016.87,7284.2 ; 7016.87,7302.2 7016.87,7469.2 ; 7017.5,1798.09 7017.5,1805.09 ; 7017.5,1807.09 7017.5,1860.09 ; 7017.5,1917.09 7017.5,1978.09 ; 7017.5,2012.09 7017.5,2146.09 ; 7017.5,2170.09 7017.5,2232.09 ; 7017.5,2302.09 7017.5,2365.09 ; 7017.87,7035.2 7017.87,7038.2 ; 7017.87,7061.2 7017.87,7064.2 ; 7017.87,7066.2 7017.87,7076.2 ; 7017.87,7079.2 7017.87,7084.2 ; 7017.87,7093.2 7017.87,7095.2 ; 7017.87,7119.2 7017.87,7124.2 ; 7017.87,7125.2 7017.87,7171.2 ; 7017.87,7222.2 7017.87,7284.2 ; 7017.87,7302.2 7017.87,7469.2 ; 7018.5,1798.09 7018.5,1805.09 ; 7018.5,1807.09 7018.5,1860.09 ; 7018.5,1917.09 7018.5,1978.09 ; 7018.5,2014.09 7018.5,2144.09 ; 7018.5,2169.09 7018.5,2231.09 ; 7018.5,2302.09 7018.5,2366.09 ; 7018.87,7034.2 7018.87,7038.2 ; 7018.87,7061.2 7018.87,7064.2 ; 7018.87,7066.2 7018.87,7076.2 ; 7018.87,7079.2 7018.87,7084.2 ; 7018.87,7093.2 7018.87,7095.2 ; 7018.87,7108.2 7018.87,7111.2 ; 7018.87,7119.2 7018.87,7124.2 ; 7018.87,7125.2 7018.87,7172.2 ; 7018.87,7222.2 7018.87,7284.2 ; 7018.87,7301.2 7018.87,7469.2 ; 7019.5,1798.09 7019.5,1805.09 ; 7019.5,1807.09 7019.5,1860.09 ; 7019.5,1917.09 7019.5,1978.09 ; 7019.5,2015.09 7019.5,2143.09 ; 7019.5,2169.09 7019.5,2231.09 ; 7019.5,2303.09 7019.5,2366.09 ; 7019.87,7034.2 7019.87,7038.2 ; 7019.87,7060.2 7019.87,7065.2 ; 7019.87,7066.2 7019.87,7076.2 ; 7019.87,7079.2 7019.87,7083.2 ; 7019.87,7093.2 7019.87,7095.2 ; 7019.87,7108.2 7019.87,7111.2 ; 7019.87,7119.2 7019.87,7124.2 ; 7019.87,7126.2 7019.87,7173.2 ; 7019.87,7222.2 7019.87,7284.2 ; 7019.87,7301.2 7019.87,7470.2 ; 7020.5,1798.09 7020.5,1806.09 ; 7020.5,1807.09 7020.5,1860.09 ; 7020.5,1917.09 7020.5,1979.09 ; 7020.5,2017.09 7020.5,2142.09 ; 7020.5,2169.09 7020.5,2231.09 ; 7020.5,2303.09 7020.5,2366.09 ; 7020.87,7034.2 7020.87,7039.2 ; 7020.87,7060.2 7020.87,7076.2 ; 7020.87,7079.2 7020.87,7083.2 ; 7020.87,7092.2 7020.87,7095.2 ; 7020.87,7108.2 7020.87,7111.2 ; 7020.87,7119.2 7020.87,7124.2 ; 7020.87,7126.2 7020.87,7173.2 ; 7020.87,7222.2 7020.87,7284.2 ; 7020.87,7301.2 7020.87,7470.2 ; 7021.5,1798.09 7021.5,1860.09 ; 7021.5,1917.09 7021.5,1979.09 ; 7021.5,2018.09 7021.5,2140.09 ; 7021.5,2168.09 7021.5,2231.09 ; 7021.5,2303.09 7021.5,2367.09 ; 7021.87,7034.2 7021.87,7039.2 ; 7021.87,7059.2 7021.87,7066.2 ; 7021.87,7067.2 7021.87,7076.2 ; 7021.87,7079.2 7021.87,7084.2 ; 7021.87,7093.2 7021.87,7095.2 ; 7021.87,7108.2 7021.87,7112.2 ; 7021.87,7119.2 7021.87,7124.2 ; 7021.87,7126.2 7021.87,7174.2 ; 7021.87,7221.2 7021.87,7284.2 ; 7021.87,7300.2 7021.87,7471.2 ; 7022.5,1798.09 7022.5,1860.09 ; 7022.5,1917.09 7022.5,1979.09 ; 7022.5,2020.09 7022.5,2139.09 ; 7022.5,2168.09 7022.5,2230.09 ; 7022.5,2303.09 7022.5,2367.09 ; 7022.87,7034.2 7022.87,7039.2 ; 7022.87,7059.2 7022.87,7066.2 ; 7022.87,7067.2 7022.87,7076.2 ; 7022.87,7079.2 7022.87,7084.2 ; 7022.87,7093.2 7022.87,7095.2 ; 7022.87,7109.2 7022.87,7112.2 ; 7022.87,7118.2 7022.87,7124.2 ; 7022.87,7125.2 7022.87,7175.2 ; 7022.87,7220.2 7022.87,7283.2 ; 7022.87,7300.2 7022.87,7471.2 ; 7023.5,1798.09 7023.5,1860.09 ; 7023.5,1918.09 7023.5,1979.09 ; 7023.5,2021.09 7023.5,2137.09 ; 7023.5,2168.09 7023.5,2230.09 ; 7023.5,2304.09 7023.5,2367.09 ; 7023.87,7034.2 7023.87,7039.2 ; 7023.87,7059.2 7023.87,7076.2 ; 7023.87,7079.2 7023.87,7084.2 ; 7023.87,7093.2 7023.87,7095.2 ; 7023.87,7109.2 7023.87,7112.2 ; 7023.87,7117.2 7023.87,7124.2 ; 7023.87,7125.2 7023.87,7176.2 ; 7023.87,7220.2 7023.87,7283.2 ; 7023.87,7300.2 7023.87,7471.2 ; 7024.5,1798.09 7024.5,1860.09 ; 7024.5,1918.09 7024.5,1980.09 ; 7024.5,2023.09 7024.5,2135.09 ; 7024.5,2167.09 7024.5,2230.09 ; 7024.5,2304.09 7024.5,2368.09 ; 7024.87,7035.2 7024.87,7039.2 ; 7024.87,7059.2 7024.87,7076.2 ; 7024.87,7079.2 7024.87,7084.2 ; 7024.87,7093.2 7024.87,7095.2 ; 7024.87,7109.2 7024.87,7112.2 ; 7024.87,7117.2 7024.87,7178.2 ; 7024.87,7219.2 7024.87,7283.2 ; 7024.87,7299.2 7024.87,7472.2 ; 7025.5,1798.09 7025.5,1860.09 ; 7025.5,1918.09 7025.5,1983.09 ; 7025.5,2025.09 7025.5,2133.09 ; 7025.5,2167.09 7025.5,2229.09 ; 7025.5,2304.09 7025.5,2368.09 ; 7025.87,7036.2 7025.87,7039.2 ; 7025.87,7059.2 7025.87,7076.2 ; 7025.87,7079.2 7025.87,7084.2 ; 7025.87,7093.2 7025.87,7095.2 ; 7025.87,7110.2 7025.87,7112.2 ; 7025.87,7117.2 7025.87,7179.2 ; 7025.87,7217.2 7025.87,7283.2 ; 7025.87,7299.2 7025.87,7472.2 ; 7026.5,1798.09 7026.5,1860.09 ; 7026.5,1918.09 7026.5,1984.09 ; 7026.5,2027.09 7026.5,2131.09 ; 7026.5,2166.09 7026.5,2229.09 ; 7026.5,2305.09 7026.5,2368.09 ; 7026.87,7036.2 7026.87,7039.2 ; 7026.87,7059.2 7026.87,7076.2 ; 7026.87,7079.2 7026.87,7084.2 ; 7026.87,7093.2 7026.87,7095.2 ; 7026.87,7110.2 7026.87,7112.2 ; 7026.87,7117.2 7026.87,7181.2 ; 7026.87,7216.2 7026.87,7282.2 ; 7026.87,7298.2 7026.87,7472.2 ; 7027.5,1798.09 7027.5,1860.09 ; 7027.5,1918.09 7027.5,1984.09 ; 7027.5,2029.09 7027.5,2129.09 ; 7027.5,2166.09 7027.5,2229.09 ; 7027.87,7036.2 7027.87,7040.2 ; 7027.87,7060.2 7027.87,7076.2 ; 7027.87,7079.2 7027.87,7084.2 ; 7027.87,7093.2 7027.87,7095.2 ; 7027.87,7110.2 7027.87,7112.2 ; 7027.87,7117.2 7027.87,7184.2 ; 7027.87,7213.2 7027.87,7282.2 ; 7027.87,7298.2 7027.87,7473.2 ; 7028.5,1798.09 7028.5,1860.09 ; 7028.5,1918.09 7028.5,1984.09 ; 7028.5,2031.09 7028.5,2127.09 ; 7028.5,2166.09 7028.5,2229.09 ; 7028.87,7036.2 7028.87,7040.2 ; 7028.87,7044.2 7028.87,7045.2 ; 7028.87,7060.2 7028.87,7076.2 ; 7028.87,7079.2 7028.87,7085.2 ; 7028.87,7093.2 7028.87,7095.2 ; 7028.87,7111.2 7028.87,7112.2 ; 7028.87,7117.2 7028.87,7188.2 ; 7028.87,7210.2 7028.87,7282.2 ; 7028.87,7298.2 7028.87,7473.2 ; 7029.5,1798.09 7029.5,1860.09 ; 7029.5,1919.09 7029.5,1984.09 ; 7029.5,2034.09 7029.5,2124.09 ; 7029.5,2166.09 7029.5,2228.09 ; 7029.87,7036.2 7029.87,7040.2 ; 7029.87,7044.2 7029.87,7046.2 ; 7029.87,7060.2 7029.87,7076.2 ; 7029.87,7079.2 7029.87,7085.2 ; 7029.87,7093.2 7029.87,7095.2 ; 7029.87,7111.2 7029.87,7113.2 ; 7029.87,7117.2 7029.87,7282.2 ; 7029.87,7298.2 7029.87,7473.2 ; 7030.5,1798.09 7030.5,1860.09 ; 7030.5,1919.09 7030.5,1984.09 ; 7030.5,2037.09 7030.5,2122.09 ; 7030.5,2165.09 7030.5,2228.09 ; 7030.87,7036.2 7030.87,7040.2 ; 7030.87,7043.2 7030.87,7046.2 ; 7030.87,7059.2 7030.87,7076.2 ; 7030.87,7079.2 7030.87,7085.2 ; 7030.87,7092.2 7030.87,7095.2 ; 7030.87,7111.2 7030.87,7113.2 ; 7030.87,7117.2 7030.87,7281.2 ; 7030.87,7297.2 7030.87,7474.2 ; 7031.5,1798.09 7031.5,1860.09 ; 7031.5,1919.09 7031.5,1984.09 ; 7031.5,2040.09 7031.5,2118.09 ; 7031.5,2165.09 7031.5,2228.09 ; 7031.87,6926.2 7031.87,6927.2 ; 7031.87,7036.2 7031.87,7040.2 ; 7031.87,7043.2 7031.87,7046.2 ; 7031.87,7059.2 7031.87,7076.2 ; 7031.87,7078.2 7031.87,7085.2 ; 7031.87,7092.2 7031.87,7096.2 ; 7031.87,7111.2 7031.87,7113.2 ; 7031.87,7118.2 7031.87,7281.2 ; 7031.87,7297.2 7031.87,7474.2 ; 7032.5,2043.09 7032.5,2115.09 ; 7032.87,6924.2 7032.87,6929.2 ; 7032.87,7036.2 7032.87,7040.2 ; 7032.87,7043.2 7032.87,7046.2 ; 7032.87,7060.2 7032.87,7076.2 ; 7032.87,7078.2 7032.87,7085.2 ; 7032.87,7091.2 7032.87,7096.2 ; 7032.87,7112.2 7032.87,7113.2 ; 7032.87,7118.2 7032.87,7280.2 ; 7032.87,7296.2 7032.87,7475.2 ; 7033.5,2048.09 7033.5,2111.09 ; 7033.87,6923.2 7033.87,6930.2 ; 7033.87,7036.2 7033.87,7040.2 ; 7033.87,7043.2 7033.87,7046.2 ; 7033.87,7060.2 7033.87,7076.2 ; 7033.87,7078.2 7033.87,7084.2 ; 7033.87,7091.2 7033.87,7096.2 ; 7033.87,7112.2 7033.87,7113.2 ; 7033.87,7118.2 7033.87,7280.2 ; 7033.87,7296.2 7033.87,7475.2 ; 7034.5,2051.09 7034.5,2107.09 ; 7034.87,6922.2 7034.87,6930.2 ; 7034.87,6958.2 7034.87,6960.2 ; 7034.87,7036.2 7034.87,7040.2 ; 7034.87,7042.2 7034.87,7048.2 ; 7034.87,7060.2 7034.87,7076.2 ; 7034.87,7078.2 7034.87,7084.2 ; 7034.87,7090.2 7034.87,7096.2 ; 7034.87,7119.2 7034.87,7279.2 ; 7035.87,6922.2 7035.87,6929.2 ; 7035.87,6958.2 7035.87,6960.2 ; 7035.87,7036.2 7035.87,7039.2 ; 7035.87,7042.2 7035.87,7049.2 ; 7035.87,7061.2 7035.87,7076.2 ; 7035.87,7078.2 7035.87,7084.2 ; 7035.87,7088.2 7035.87,7096.2 ; 7035.87,7119.2 7035.87,7279.2 ; 7035.87,7295.2 7035.87,7476.2 ; 7036.87,6924.2 7036.87,6929.2 ; 7036.87,6957.2 7036.87,6960.2 ; 7036.87,7036.2 7036.87,7039.2 ; 7036.87,7042.2 7036.87,7050.2 ; 7036.87,7061.2 7036.87,7076.2 ; 7036.87,7078.2 7036.87,7084.2 ; 7036.87,7086.2 7036.87,7096.2 ; 7036.87,7119.2 7036.87,7279.2 ; 7036.87,7295.2 7036.87,7476.2 ; 7037.87,6925.2 7037.87,6929.2 ; 7037.87,6957.2 7037.87,6960.2 ; 7037.87,6964.2 7037.87,6968.2 ; 7037.87,7036.2 7037.87,7039.2 ; 7037.87,7041.2 7037.87,7051.2 ; 7037.87,7061.2 7037.87,7076.2 ; 7037.87,7078.2 7037.87,7083.2 ; 7037.87,7086.2 7037.87,7096.2 ; 7037.87,7119.2 7037.87,7278.2 ; 7037.87,7295.2 7037.87,7476.2 ; 7038.87,6925.2 7038.87,6930.2 ; 7038.87,6956.2 7038.87,6960.2 ; 7038.87,6964.2 7038.87,6969.2 ; 7038.87,7036.2 7038.87,7039.2 ; 7038.87,7041.2 7038.87,7050.2 ; 7038.87,7061.2 7038.87,7076.2 ; 7038.87,7078.2 7038.87,7083.2 ; 7038.87,7085.2 7038.87,7096.2 ; 7038.87,7119.2 7038.87,7278.2 ; 7038.87,7294.2 7038.87,7477.2 ; 7039.87,6925.2 7039.87,6930.2 ; 7039.87,6956.2 7039.87,6960.2 ; 7039.87,6963.2 7039.87,6969.2 ; 7039.87,7036.2 7039.87,7039.2 ; 7039.87,7041.2 7039.87,7048.2 ; 7039.87,7061.2 7039.87,7076.2 ; 7039.87,7078.2 7039.87,7083.2 ; 7039.87,7085.2 7039.87,7096.2 ; 7039.87,7119.2 7039.87,7277.2 ; 7039.87,7294.2 7039.87,7477.2 ; 7040.87,6925.2 7040.87,6930.2 ; 7040.87,6956.2 7040.87,6960.2 ; 7040.87,6963.2 7040.87,6969.2 ; 7040.87,7036.2 7040.87,7039.2 ; 7040.87,7040.2 7040.87,7046.2 ; 7040.87,7061.2 7040.87,7076.2 ; 7040.87,7078.2 7040.87,7083.2 ; 7040.87,7085.2 7040.87,7096.2 ; 7040.87,7116.2 7040.87,7117.2 ; 7040.87,7119.2 7040.87,7277.2 ; 7040.87,7293.2 7040.87,7478.2 ; 7041.87,6923.2 7041.87,6929.2 ; 7041.87,6951.2 7041.87,6955.2 ; 7041.87,6956.2 7041.87,6960.2 ; 7041.87,6963.2 7041.87,6969.2 ; 7041.87,6970.2 7041.87,6973.2 ; 7041.87,7036.2 7041.87,7039.2 ; 7041.87,7040.2 7041.87,7046.2 ; 7041.87,7061.2 7041.87,7077.2 ; 7041.87,7078.2 7041.87,7083.2 ; 7041.87,7085.2 7041.87,7096.2 ; 7041.87,7117.2 7041.87,7276.2 ; 7041.87,7293.2 7041.87,7478.2 ; 7042.87,6923.2 7042.87,6929.2 ; 7042.87,6947.2 7042.87,6949.2 ; 7042.87,6950.2 7042.87,6955.2 ; 7042.87,6956.2 7042.87,6960.2 ; 7042.87,6963.2 7042.87,6969.2 ; 7042.87,6970.2 7042.87,6973.2 ; 7042.87,7036.2 7042.87,7039.2 ; 7042.87,7040.2 7042.87,7046.2 ; 7042.87,7060.2 7042.87,7077.2 ; 7042.87,7078.2 7042.87,7083.2 ; 7042.87,7086.2 7042.87,7096.2 ; 7042.87,7118.2 7042.87,7275.2 ; 7042.87,7293.2 7042.87,7478.2 ; 7043.87,6925.2 7043.87,6930.2 ; 7043.87,6946.2 7043.87,6960.2 ; 7043.87,6963.2 7043.87,6968.2 ; 7043.87,6969.2 7043.87,6974.2 ; 7043.87,7036.2 7043.87,7046.2 ; 7043.87,7060.2 7043.87,7084.2 ; 7043.87,7086.2 7043.87,7096.2 ; 7043.87,7119.2 7043.87,7275.2 ; 7043.87,7293.2 7043.87,7478.2 ; 7044.87,6925.2 7044.87,6930.2 ; 7044.87,6946.2 7044.87,6960.2 ; 7044.87,6963.2 7044.87,6968.2 ; 7044.87,6969.2 7044.87,6975.2 ; 7044.87,7036.2 7044.87,7047.2 ; 7044.87,7060.2 7044.87,7084.2 ; 7044.87,7086.2 7044.87,7096.2 ; 7044.87,7119.2 7044.87,7274.2 ; 7044.87,7292.2 7044.87,7479.2 ; 7045.87,6925.2 7045.87,6929.2 ; 7045.87,6930.2 7045.87,6932.2 ; 7045.87,6946.2 7045.87,6953.2 ; 7045.87,6954.2 7045.87,6955.2 ; 7045.87,6956.2 7045.87,6960.2 ; 7045.87,6963.2 7045.87,6975.2 ; 7045.87,7036.2 7045.87,7048.2 ; 7045.87,7060.2 7045.87,7076.2 ; 7045.87,7078.2 7045.87,7096.2 ; 7045.87,7120.2 7045.87,7273.2 ; 7045.87,7292.2 7045.87,7353.2 ; 7045.87,7417.2 7045.87,7479.2 ; 7046.87,6925.2 7046.87,6934.2 ; 7046.87,6942.2 7046.87,6943.2 ; 7046.87,6946.2 7046.87,6952.2 ; 7046.87,6956.2 7046.87,6960.2 ; 7046.87,6963.2 7046.87,6975.2 ; 7046.87,7034.2 7046.87,7049.2 ; 7046.87,7059.2 7046.87,7076.2 ; 7046.87,7078.2 7046.87,7096.2 ; 7046.87,7120.2 7046.87,7273.2 ; 7046.87,7291.2 7046.87,7352.2 ; 7046.87,7417.2 7046.87,7480.2 ; 7047.87,6924.2 7047.87,6935.2 ; 7047.87,6941.2 7047.87,6945.2 ; 7047.87,6946.2 7047.87,6953.2 ; 7047.87,6956.2 7047.87,6960.2 ; 7047.87,6963.2 7047.87,6975.2 ; 7047.87,7034.2 7047.87,7051.2 ; 7047.87,7059.2 7047.87,7076.2 ; 7047.87,7078.2 7047.87,7096.2 ; 7047.87,7121.2 7047.87,7272.2 ; 7047.87,7291.2 7047.87,7352.2 ; 7047.87,7417.2 7047.87,7480.2 ; 7048.87,6922.2 7048.87,6935.2 ; 7048.87,6940.2 7048.87,6954.2 ; 7048.87,6955.2 7048.87,6960.2 ; 7048.87,6963.2 7048.87,6975.2 ; 7048.87,7034.2 7048.87,7050.2 ; 7048.87,7059.2 7048.87,7096.2 ; 7048.87,7122.2 7048.87,7271.2 ; 7048.87,7291.2 7048.87,7352.2 ; 7048.87,7418.2 7048.87,7480.2 ; 7049.87,6920.2 7049.87,6936.2 ; 7049.87,6938.2 7049.87,6960.2 ; 7049.87,6963.2 7049.87,6975.2 ; 7049.87,7034.2 7049.87,7055.2 ; 7049.87,7058.2 7049.87,7076.2 ; 7049.87,7078.2 7049.87,7096.2 ; 7049.87,7123.2 7049.87,7270.2 ; 7049.87,7290.2 7049.87,7352.2 ; 7049.87,7418.2 7049.87,7481.2 ; 7050.87,6919.2 7050.87,6936.2 ; 7050.87,6937.2 7050.87,6960.2 ; 7050.87,6962.2 7050.87,6974.2 ; 7050.87,7034.2 7050.87,7057.2 ; 7050.87,7058.2 7050.87,7076.2 ; 7050.87,7078.2 7050.87,7096.2 ; 7050.87,7124.2 7050.87,7269.2 ; 7050.87,7290.2 7050.87,7351.2 ; 7050.87,7418.2 7050.87,7481.2 ; 7051.87,6918.2 7051.87,6935.2 ; 7051.87,6937.2 7051.87,6960.2 ; 7051.87,6962.2 7051.87,6975.2 ; 7051.87,7034.2 7051.87,7096.2 ; 7051.87,7125.2 7051.87,7269.2 ; 7051.87,7290.2 7051.87,7351.2 ; 7051.87,7419.2 7051.87,7481.2 ; 7052.87,6916.2 7052.87,6935.2 ; 7052.87,6937.2 7052.87,6960.2 ; 7052.87,6961.2 7052.87,6975.2 ; 7052.87,7034.2 7052.87,7096.2 ; 7052.87,7126.2 7052.87,7268.2 ; 7052.87,7289.2 7052.87,7351.2 ; 7052.87,7419.2 7052.87,7482.2 ; 7053.87,6916.2 7053.87,6936.2 ; 7053.87,6937.2 7053.87,6975.2 ; 7053.87,7035.2 7053.87,7096.2 ; 7053.87,7127.2 7053.87,7266.2 ; 7053.87,7289.2 7053.87,7351.2 ; 7053.87,7419.2 7053.87,7482.2 ; 7054.87,6916.2 7054.87,6978.2 ; 7054.87,7035.2 7054.87,7096.2 ; 7054.87,7128.2 7054.87,7266.2 ; 7054.87,7289.2 7054.87,7350.2 ; 7054.87,7419.2 7054.87,7483.2 ; 7055.87,6916.2 7055.87,6923.2 ; 7055.87,6924.2 7055.87,6978.2 ; 7055.87,7035.2 7055.87,7096.2 ; 7055.87,7129.2 7055.87,7265.2 ; 7055.87,7288.2 7055.87,7350.2 ; 7055.87,7420.2 7055.87,7483.2 ; 7056.87,6916.2 7056.87,6923.2 ; 7056.87,6925.2 7056.87,6978.2 ; 7056.87,7035.2 7056.87,7096.2 ; 7056.87,7130.2 7056.87,7264.2 ; 7056.87,7288.2 7056.87,7350.2 ; 7056.87,7420.2 7056.87,7483.2 ; 7057.87,6916.2 7057.87,6923.2 ; 7057.87,6925.2 7057.87,6978.2 ; 7057.87,7035.2 7057.87,7096.2 ; 7057.87,7132.2 7057.87,7262.2 ; 7057.87,7287.2 7057.87,7349.2 ; 7057.87,7420.2 7057.87,7484.2 ; 7058.87,6916.2 7058.87,6923.2 ; 7058.87,6925.2 7058.87,6978.2 ; 7058.87,7035.2 7058.87,7096.2 ; 7058.87,7133.2 7058.87,7261.2 ; 7058.87,7287.2 7058.87,7349.2 ; 7058.87,7421.2 7058.87,7484.2 ; 7059.87,6916.2 7059.87,6924.2 ; 7059.87,6925.2 7059.87,6978.2 ; 7059.87,7035.2 7059.87,7097.2 ; 7059.87,7135.2 7059.87,7260.2 ; 7059.87,7287.2 7059.87,7349.2 ; 7059.87,7421.2 7059.87,7484.2 ; 7060.87,6916.2 7060.87,6978.2 ; 7060.87,7035.2 7060.87,7097.2 ; 7060.87,7136.2 7060.87,7258.2 ; 7060.87,7286.2 7060.87,7349.2 ; 7060.87,7421.2 7060.87,7485.2 ; 7061.87,6916.2 7061.87,6978.2 ; 7061.87,7035.2 7061.87,7097.2 ; 7061.87,7138.2 7061.87,7257.2 ; 7061.87,7286.2 7061.87,7348.2 ; 7061.87,7421.2 7061.87,7485.2 ; 7062.87,6916.2 7062.87,6978.2 ; 7062.87,7036.2 7062.87,7097.2 ; 7062.87,7139.2 7062.87,7255.2 ; 7062.87,7286.2 7062.87,7348.2 ; 7062.87,7422.2 7062.87,7485.2 ; 7063.87,6916.2 7063.87,6978.2 ; 7063.87,7036.2 7063.87,7098.2 ; 7063.87,7141.2 7063.87,7253.2 ; 7063.87,7285.2 7063.87,7348.2 ; 7063.87,7422.2 7063.87,7486.2 ; 7064.87,6916.2 7064.87,6978.2 ; 7064.87,7036.2 7064.87,7101.2 ; 7064.87,7143.2 7064.87,7251.2 ; 7064.87,7285.2 7064.87,7347.2 ; 7064.87,7422.2 7064.87,7486.2 ; 7065.87,6916.2 7065.87,6978.2 ; 7065.87,7036.2 7065.87,7102.2 ; 7065.87,7145.2 7065.87,7249.2 ; 7065.87,7284.2 7065.87,7347.2 ; 7065.87,7423.2 7065.87,7486.2 ; 7066.87,6916.2 7066.87,6978.2 ; 7066.87,7036.2 7066.87,7102.2 ; 7066.87,7147.2 7066.87,7247.2 ; 7066.87,7284.2 7066.87,7347.2 ; 7067.87,6916.2 7067.87,6978.2 ; 7067.87,7036.2 7067.87,7102.2 ; 7067.87,7149.2 7067.87,7245.2 ; 7067.87,7284.2 7067.87,7347.2 ; 7068.87,6916.2 7068.87,6978.2 ; 7068.87,7037.2 7068.87,7102.2 ; 7068.87,7152.2 7068.87,7242.2 ; 7068.87,7284.2 7068.87,7346.2 ; 7069.87,6916.2 7069.87,6978.2 ; 7069.87,7037.2 7069.87,7102.2 ; 7069.87,7155.2 7069.87,7240.2 ; 7069.87,7283.2 7069.87,7346.2 ; 7070.87,6916.2 7070.87,6978.2 ; 7070.87,7037.2 7070.87,7102.2 ; 7070.87,7158.2 7070.87,7236.2 ; 7070.87,7283.2 7070.87,7346.2 ; 7071.87,7161.2 7071.87,7233.2 ; 7072.87,7166.2 7072.87,7229.2 ; 7073.87,7169.2 7073.87,7225.2
  Top Layer w19.68: 6053.43,2853.16 6262.64,2853.16 ; 6092.8,7971.27 6302.01,7971.27 ; v1@6093.43,3350.4 6310.46,3350.4 ; v1@6132.8,8468.51 6349.83,8468.51